# Altium PCB iMX6 Rex_V1I1_PCB.PcbDoc (part 4 of 8)
Units mm, origin at the board's own origin, x right, y up, seen from the top; angles counter-clockwise.
Board outline 70 x 40 mm, 12 copper layers (L1, L2, L3, L4, L5 (PWR), L6 (PWR), L7 (PWR), L8 (PWR), L9, L10, L11, L12), stack 1.566 mm thick; 473 components, 409 nets, 2294 pads, 1880 vias.
Unrouted connection lines stored in the file: 7.
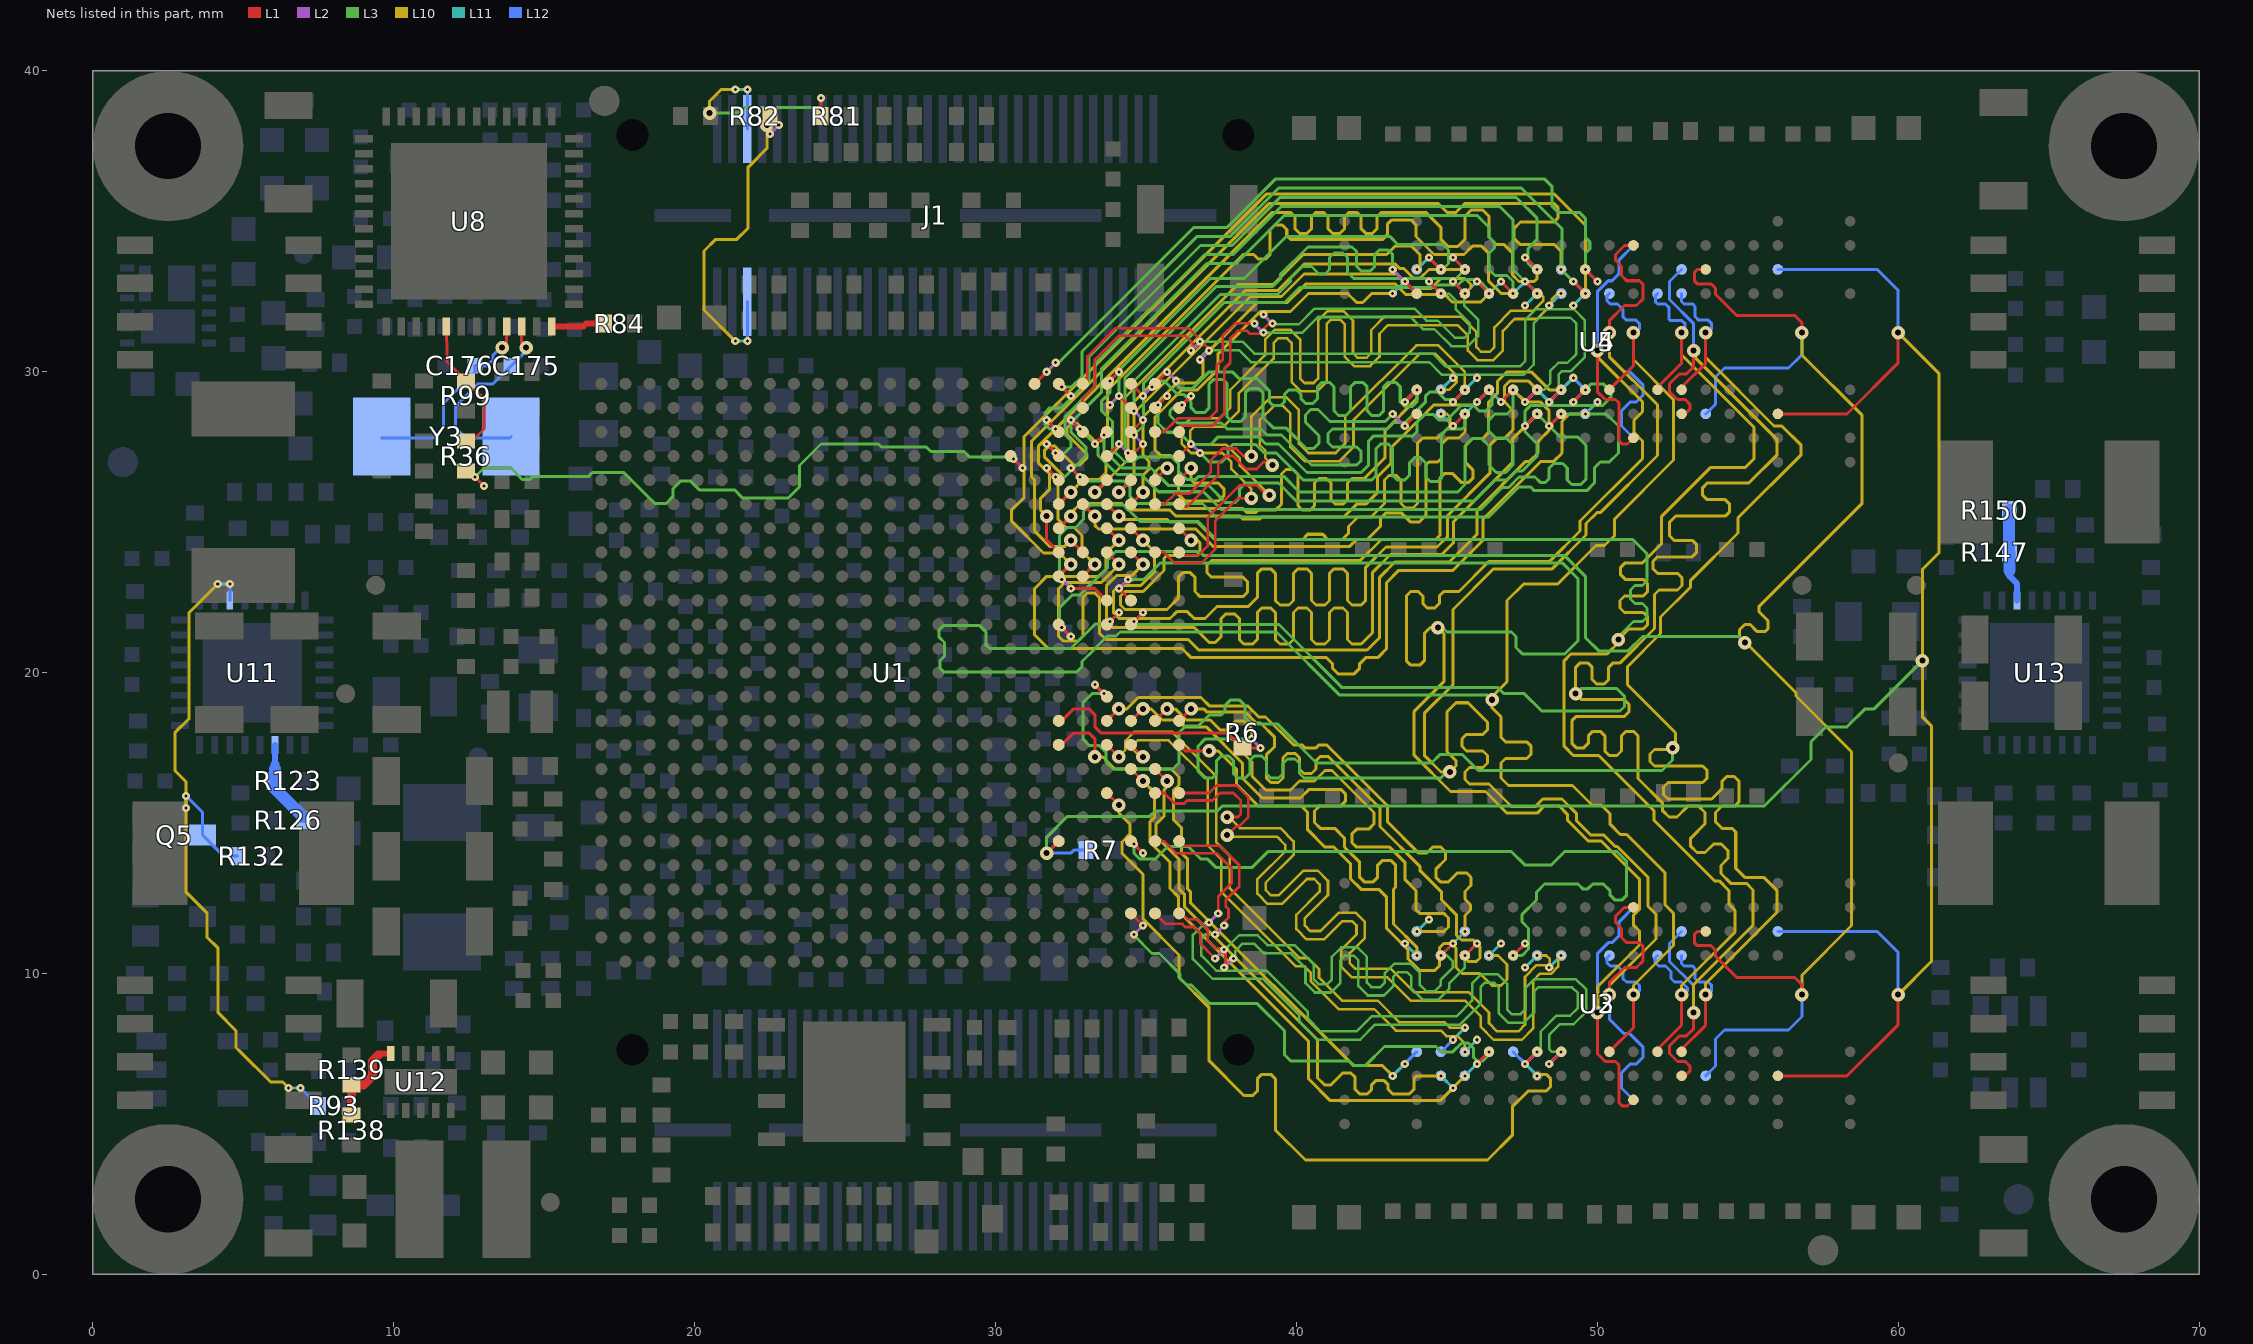
[diagram p14: the nets of this part, all layers, seen from the top]

## Via types
v1: diameter 0.45, hole 0.2, L1 to L12, tented both sides, 761 vias
v2: diameter 0.27, hole 0.1, L1 to L2, 305 vias
v3: diameter 0.27, hole 0.1, L2 to L3, 290 vias
v4: diameter 0.45, hole 0.2, L3 to L10, 196 vias
v5: diameter 0.27, hole 0.1, L11 to L12, 185 vias
v6: diameter 0.27, hole 0.1, L10 to L11, 142 vias
v7: diameter 0.45, hole 0.2, L3 to L10, tented both sides, 1 vias

## Nets (pads, with @x,y where several pads share a name; then routed paths per layer and width w, separated by ;. In a path a pad name is that pad's centre, name@x,y a point inside that pad or via, vN(x,y) a via of type N, cw(c..) or ccw(c..) an arc to the next point about the centre after c; other vN are vias at no path point) (continued)
DRAM_D25: U1.Y10 U3.A7 | length 19.9
  L1 w0.1: U1.Y10@32.1,17.6 32.2,17.6 32.6,18 33.1,18 33.3,17.8 v1(33.3,17.2)
  L10 w0.1: v1(33.3,17.2) 33.57,17.2 33.97,16.8 35.83,16.8 36.1,16.53 36.1,16.27 35.909,16.078 35.909,15.122 36.183,14.847 36.183,14 36.383,13.8 36.383,12.813 36.475,12.721 36.475,12.362 41.9,6.937 42.863,6.937 v6(43.2,6.6)
  L11 w0.1: v6(43.2,6.6) v5(43.6,7)
  L12 w0.1: v5(43.6,7) U3.A7@44,7.4
DRAM_D26: U1.AE11 U3.C3 | length 19.8
  L1 w0.1: U1.AE11@36.1,18.4 v1(36.5,18.8)
  L10 w0.1: v1(36.5,18.8) 36.917,18.8 37.017,18.7 38.287,18.7 38.662,18.325 38.805,18.325 39.275,17.855 39.275,17.545 39,17.27 39,16.5 39.15,16.35 39.4,16.35 39.55,16.5 39.55,17.17 39.7,17.32 39.95,17.32 40.1,17.17 40.1,16.8 40.25,16.65 40.5,16.65 40.65,16.8 40.65,17.07 40.8,17.22 41.05,17.22 42.775,15.495 42.775,14.888 44.1,13.563 44.1,13.43 44.825,12.705 44.825,12.445 45.315,11.955 45.315,11.282 45.482,11.115 45.885,11.115 46.1,10.9 46.1,10.52 45.98,10.4 45.7,10.4 45.6,10.5 v6(45.6,10.6)
  L11 w0.1: v6(45.6,10.6) v5(46,11)
  L12 w0.1: v6(45.6,10.6) v5(46,11)
DRAM_D27: U1.AB11 U3.C2 | length 19.8
  L1 w0.1: U1.AB11@33.7,18.4 v1(34.1,18.8)
  L10 w0.1: v1(34.1,18.8) 34.37,18.8 34.745,19.175 36.825,19.175 37.1,18.9 38.37,18.9 38.745,18.525 38.975,18.525 39.9,17.6 40.181,17.6 40.291,17.491 40.641,17.491 40.75,17.6 41,17.6 43.025,15.575 43.025,15.041 44.066,14 44.321,14 44.53,14.209 44.8,14.209 44.95,14.059 44.95,13.789 44.63,13.47 44.63,13.2 44.78,13.05 45.05,13.05 45.35,13.35 45.65,13.35 45.8,13.2 45.8,12.93 45.6,12.73 45.6,12.47 45.785,12.285 45.785,12.115 45.6,11.93 v6(45.6,11.4)
  L11 w0.1: v5(45.2,11) v6(45.6,11.4)
  L12 w0.1: v5(45.2,11) v6(45.6,11.4)
DRAM_D28: U1.AC9 U3.C8 | length 19.8
  L1 w0.1: U1.AC9@34.5,16.8 v1(34.9,16.4)
  L10 w0.1: v1(34.9,16.4) 35.275,16.025 35.275,15.188 35.125,15.038 35.125,14.375 35.8,13.7 35.8,12.83 36.075,12.555 36.075,12.079 40.4,7.754 40.4,6.5 41.125,5.775 44.775,5.775 v6(45.6,6.6)
  L11 w0.1: v6(45.6,6.6) v5(46,7)
  L12 w0.1: v6(45.6,6.6) v5(46,7)
DRAM_D29: U1.AD9 U3.B8 | length 19.8
  L1 w0.1: U1.AD9@35.3,16.8 v1(35.7,16.4)
  L10 w0.1: v1(35.7,16.4) 35.7,16.2 35.604,16.104 35.604,15.235 35.325,14.955 35.325,14.575 36.092,13.809 36.092,12.822 36.275,12.638 36.275,12.225 40.7,7.8 40.7,6.53 40.93,6.3 41.15,6.3 41.55,6.7 41.8,6.7 41.95,6.55 41.95,6.15 42.1,6 42.35,6 42.5,6.15 42.5,6.3 42.65,6.45 42.9,6.45 43.05,6.3 43.05,6.15 43.2,6 43.75,6 43.9,6.15 43.9,6.5 44,6.6 v6(44.8,6.6)
  L11 w0.1: v6(44.8,6.6) v5(45.2,6.2)
  L12 w0.1: v6(44.8,6.6) v5(45.2,6.2)
DRAM_D30: U1.AD11 U3.A2 | length 19.8
  L1 w0.1: U1.AD11@35.3,18.4 v1(35.7,18.8)
  L10 w0.1: v1(35.7,18.8) 35.97,18.8 36.345,18.425 37.132,18.425 37.457,18.1 37.7,18.1 38,18.4 38.243,18.4 38.525,18.118 38.525,17.875 38.225,17.575 38.225,17.332 38.525,17.032 38.525,16.558 38.983,16.1 39.8,16.1 40.1,16.4 40.6,16.4 40.95,16.75 41.18,16.75 42.575,15.355 42.575,14.975 42.4,14.8 42,14.8 41.85,14.65 41.85,14.35 42,14.2 43.1,14.2 43.6,13.7 43.6,13.13 43.975,12.755 43.975,12.125 44.1,12 44.9,12 45.05,11.85 45.05,11.55 44.9,11.4 v6(44,11.4)
  L11 w0.1: v6(44,11.4) v5(44.4,11.8)
  L12 w0.1: v6(44,11.4) v5(44.4,11.8)
DRAM_D31: U1.AC11 U3.A3 | length 19.8
  L1 w0.1: U1.AC11@34.5,18.4 v1(34.9,18.8)
  L10 w0.1: v1(34.9,18.8) 35.17,18.8 35.545,18.425 36.062,18.425 36.287,18.2 37,18.2 38.2,17 38.2,16.5 38.863,15.837 40.137,15.837 40.425,16.125 41.475,16.125 41.625,15.975 41.625,15.725 41.475,15.575 40.775,15.575 40.6,15.4 40.6,15.02 40.795,14.825 41.275,14.825 41.6,14.5 41.6,14.2 42.1,13.7 42.1,13.2 42.25,13.05 42.55,13.05 42.7,13.2 42.7,13.6 42.85,13.75 43.15,13.75 43.3,13.6 43.3,12.875 43.225,12.8 43.225,11.645 44,10.87 v6(44,10.6)
  L11 w0.1: v5(43.6,11) v6(44,10.6)
  L12 w0.1: v5(43.6,11) v6(44,10.6)
DRAM_D32: U1.AA17 U5.E3 | length 31.9
  L1 w0.1: U1.AA17@32.9,23.2 v1(33.3,23.6)
  L10 w0.1: v1(33.3,23.6) 32.875,24.025 32.875,24.555 32.605,24.825 32.345,24.825 32.075,25.095 32.075,26.205 32.235,26.365 32.235,26.565 31.622,27.177 31.622,27.377 31.773,27.527 31.972,27.527 32.6,26.9 32.8,26.9 33.025,27.125 33.025,27.275 32.373,27.928 32.373,28.127 32.523,28.277 32.722,28.277 33.3,27.7 33.5,27.7 33.725,27.925 33.725,29.397 38.228,33.9 38.578,33.9 38.728,33.75 38.978,33.75 39.128,33.9 39.128,34.728 39.278,34.878 39.528,34.878 39.678,34.728 39.678,34.522 39.8,34.4 42.87,34.4 43.02,34.55 43.02,34.9 43.17,35.05 43.815,35.05 43.975,34.89 43.975,34.495 44.57,33.9 45.57,33.9 45.845,34.175 46.155,34.175 46.375,33.955 46.375,33.028 46.803,32.6 v6(47.2,32.6)
  L11 w0.1: v6(47.2,32.6) v5(47.6,33)
  L12 w0.1: v6(47.2,32.6) v5(47.6,33)
DRAM_D33: U1.AA18 U5.G2 | length 31.9
  L1 w0.1: v1(32.5,24.4) U1.AA18@32.9,24
  L10 w0.1: v1(32.5,24.4) 32.3,24.2 31.8,24.2 31.3,24.7 31.3,26.4 31.2,26.5 31.2,27.7 39.1,35.6 44.7,35.6 45,35.3 45.3,35.3 45.6,35.6 48.55,35.6 48.7,35.45 48.7,35.12 48.555,34.975 47.445,34.975 47.225,34.755 47.225,34.445 47.445,34.225 48.575,34.225 48.8,34 v6(48.8,33.4)
  L11 w0.1: v6(48.8,33.4) v5(49.2,33)
  L12 w0.1: v6(48.8,33.4) v5(49.2,33)
DRAM_D34: U1.AC18 U5.F8 | length 31.9
  L1 w0.1: U1.AC18@34.5,24 v1(34.9,23.6)
  L10 w0.1: v1(34.9,23.6) 34.525,23.225 34.021,23.225 33.683,22.887 33.683,21.702 33.885,21.5 36.6,21.5 37.1,21 37.3,21 37.5,21.2 37.5,21.8 37.65,21.95 37.95,21.95 38.1,21.8 38.1,21.1 38.25,20.95 38.55,20.95 38.7,21.1 38.7,22 38.85,22.15 39.15,22.15 39.3,22 39.3,21.1 39.45,20.95 39.75,20.95 39.9,21.1 39.9,22 40.05,22.15 40.35,22.15 40.5,22 40.5,21.1 40.65,20.95 40.95,20.95 41.1,21.1 41.1,22 41.25,22.15 41.55,22.15 41.7,22 41.7,21.1 41.85,20.95 42.15,20.95 42.533,21.333 42.533,23.333 43.125,23.925 44.825,23.925 45.225,24.325 45.225,25.025 47.175,26.975 47.175,27.762 48,28.587 v6(48,28.6)
  L11 w0.1: v5(47.6,28.2) v6(48,28.6)
  L12 w0.1: v5(47.6,28.2) v6(48,28.6)
DRAM_D35: U1.AE19 U5.H7 | length 31.9
  L1 w0.1: U1.AE19@36.1,24.8 v1(36.5,24.4)
  L10 w0.1: v1(36.5,24.4) 36.7,24.4 36.8,24.3 36.8,24 36.7,23.9 35.7,23.9 35.6,23.8 35.6,23.392 34.908,22.7 34.3,22.7 34.15,22.55 34.15,22.25 34.3,22.1 35.7,22.1 36.075,22.475 36.075,23.175 36.225,23.325 36.475,23.325 36.625,23.175 36.625,22.7 36.8,22.525 38.225,22.525 38.375,22.675 38.375,23.025 38.225,23.175 37.175,23.175 37.025,23.325 37.025,23.575 37.175,23.725 42.125,23.725 42.825,24.425 44.625,24.425 44.775,24.575 44.775,26.475 44.925,26.625 45.175,26.625 45.475,26.325 45.725,26.325 45.875,26.475 45.875,26.725 45.625,26.975 45.625,27.555 45.845,27.775 46.18,27.775 46.375,27.97 46.375,28.972 46.685,29.282 46.685,29.685 47,30 47.803,30 48.403,29.4 v6(48.8,29.4)
  L11 w0.1: v6(48.8,29.4) v5(49.2,29.8)
  L12 w0.1: v5(49.2,29.8) U5.H7@49.6,29.4
DRAM_D36: U1.Y17 U5.H3 | length 31.9
  L1 w0.1: U1.Y17@32.1,23.2 v1(32.5,23.6)
  L10 w0.1: v1(32.5,23.6) 32.125,23.975 31.595,23.975 30.525,25.045 30.525,25.4 30.95,25.825 30.95,27.85 39,35.9 48.575,35.9 49.6,34.875 v6(49.6,32.6)
  L11 w0.1: v5(49.2,32.2) v6(49.6,32.6)
  L12 w0.1: v5(49.2,32.2) v6(49.6,32.6)
DRAM_D37: U1.Y18 U5.F2 | length 31.9
  L1 w0.1: v1(31.7,25.2) 31.7,24.4 U1.Y18@32.1,24
  L10 w0.1: v1(31.7,25.2) 31.5,25.4 31.5,25.8 31.8,26.1 31.8,26.6 31.423,26.978 31.423,27.522 39.2,35.3 39.8,35.3 39.95,35.15 39.95,34.75 40.1,34.6 40.35,34.6 40.5,34.75 40.5,35.15 40.65,35.3 40.9,35.3 41.05,35.15 41.05,34.75 41.2,34.6 41.45,34.6 41.6,34.75 41.6,35.15 41.75,35.3 42,35.3 42.15,35.15 42.15,34.75 42.3,34.6 42.525,34.6 42.675,34.75 42.675,35.15 42.825,35.3 44.3,35.3 44.8,34.8 44.8,34.4 45.03,34.17 45.37,34.17 45.6,34.4 45.6,35.17 45.8,35.37 46.2,35.37 46.4,35.17 46.4,34.47 46.645,34.225 46.905,34.225 47.175,33.955 47.175,33.225 47.4,33 47.9,33 48,33.1 v6(48,33.4)
  L11 w0.1: v5(47.6,33.8) v6(48,33.4)
  L12 w0.1: v5(47.6,33.8) v6(48,33.4)
DRAM_D38: U1.AB19 U5.H8 | length 31.9
  L1 w0.1: U1.AB19@33.7,24.8 v1(34.1,24.4)
  L10 w0.1: v1(34.1,24.4) 33.675,23.975 33.675,23.445 33.43,23.2 31.7,23.2 31.3,22.8 31.3,21.25 31.75,20.8 36.2,20.8 36.5,20.5 41,20.5 41.2,20.3 41.2,20.15 41.4,19.95 41.9,19.95 42.1,20.15 42.1,20.3 42.3,20.5 42.7,20.5 43,20.8 43,23 43.4,23.4 45.2,23.4 46.2,24.4 46.2,25.1 48.125,27.025 48.555,27.025 48.825,27.295 48.825,28.355 49.07,28.6 v6(49.6,28.6)
  L11 w0.1: v6(49.6,28.6) v5(50,29)
  L12 w0.1: v6(49.6,28.6) v5(50,29)
DRAM_D39: U1.AC19 U5.F7 | length 31.9
  L1 w0.1: U1.AC19@34.5,24.8 v1(34.9,24.4)
  L10 w0.1: v1(34.9,24.4) 35.275,24.025 35.275,23.35 34.825,22.9 34.1,22.9 33.917,22.717 33.917,21.983 34.1,21.8 35.8,21.8 36.025,22.025 36.375,22.025 36.6,21.8 36.958,21.8 37.358,22.2 38.4,22.2 38.7,22.5 38.7,23.3 38.85,23.45 39.15,23.45 39.3,23.3 39.3,22.4 39.45,22.25 39.75,22.25 39.9,22.4 39.9,23.3 40.05,23.45 40.35,23.45 40.5,23.3 40.5,22.4 40.65,22.25 40.95,22.25 41.1,22.4 41.1,23.3 41.25,23.45 41.55,23.45 41.7,23.3 41.7,22.4 41.85,22.25 42.15,22.25 42.3,22.4 42.3,23.5 42.975,24.175 44.675,24.175 45.025,24.525 45.025,25.225 46.425,26.625 46.425,27.555 46.645,27.775 46.905,27.775 47.2,28.07 47.2,28.715 46.915,29 46.915,29.518 47.097,29.7 47.7,29.7 v6(48,29.4)
  L11 w0.1: v6(48,29.4) v5(48.4,29)
  L12 w0.1: v6(48,29.4) v5(48.4,29)
DRAM_D40: U1.Y19 U5.D7 | length 18.4
  L1 w0.1: U1.Y19@32.1,24.8 v1(32.5,25.2)
  L10 w0.1: v1(32.5,25.2) 32.5,25.3 32.825,25.625 34.205,25.625 34.43,25.4 35.8,25.4 36,25.2 38.125,25.2 38.225,25.1 38.77,25.1 38.845,25.175 41.575,25.175 42,25.6 42.3,25.6 42.7,26 42.7,26.517 43.15,26.967 43.15,27.48 44.57,28.9 45.9,28.9 v6(46.4,29.4)
  L11 w0.1: v6(46.4,29.4) v5(46.8,29)
  L12 w0.1: v6(46.4,29.4) v5(46.8,29)
DRAM_D41: U1.AB20 U5.B8 | length 18.5
  L1 w0.1: U1.AB20@33.7,25.6 v1(34.1,25.2)
  L10 w0.1: v1(34.1,25.2) 34.213,25.088 35.712,25.088 35.8,25 36.713,25 37.288,24.425 40.2,24.425 40.375,24.6 40.87,24.6 41.045,24.425 41.525,24.425 41.73,24.63 41.73,24.861 42.045,25.175 42.475,25.175 42.925,25.625 42.925,26.4 43.075,26.55 43.325,26.55 43.475,26.4 43.475,25.625 43.625,25.475 43.875,25.475 44.025,25.625 44.025,27.625 44.2,27.8 44.7,27.8 45.1,28.2 45.1,28.5 45,28.6 v6(44.8,28.6)
  L11 w0.1: v6(44.8,28.6) v5(45.2,28.2)
  L12 w0.1: v6(44.8,28.6) v5(45.2,28.2)
DRAM_D42: U1.AB21 U5.C2 | length 18.4
  L1 w0.1: v1(33.3,26) U1.AB21@33.7,26.4
  L10 w0.1: v1(33.3,26) 33.313,26 34.4,27.087 34.4,28.8 38.3,32.7 39.383,32.7 40.258,33.575 43.295,33.575 43.445,33.425 43.572,33.425 43.882,33.115 44.118,33.115 44.403,33.4 v6(45.6,33.4)
  L11 w0.1: v5(45.2,33) v6(45.6,33.4)
  L12 w0.1: v5(45.2,33) v6(45.6,33.4)
DRAM_D43: U1.AD21 U5.A7 | length 18.4
  L1 w0.1: U1.AD21@35.3,26.4 v1(35.7,26.8)
  L10 w0.1: v1(35.7,26.8) 35.434,26.8 35.275,26.641 35.275,25.825 35.5,25.6 36,25.6 36.15,25.45 38.22,25.45 38.345,25.325 38.655,25.325 38.73,25.4 39.3,25.4 39.5,25.6 39.5,26.6 39.65,26.75 39.9,26.75 40.05,26.6 40.05,25.55 40.2,25.4 40.45,25.4 40.6,25.55 40.6,26.3 40.75,26.45 41,26.45 41.15,26.3 41.15,25.75 41.3,25.6 41.55,25.6 41.7,25.75 41.7,26.3 41.85,26.45 42.25,26.45 42.95,27.15 42.95,28.05 44,29.1 v6(44,29.4)
  L11 w0.1: v5(43.6,29) v6(44,29.4)
  L12 w0.1: v5(43.6,29) v6(44,29.4)
DRAM_D44: U1.Y20 U5.A2 | length 18.4
  L1 w0.1: U1.Y20@32.1,25.6 v1(32.5,26)
  L10 w0.1: v1(32.5,26) 32.925,26.425 33.455,26.425 33.675,26.645 33.675,27.075 34.2,27.6 34.2,29.046 38.054,32.9 39.23,32.9 40.23,33.9 43,33.9 43.275,34.175 43.825,34.175 44.1,33.9 44.1,33.5 v6(44,33.4)
  L11 w0.1: v6(44,33.4) v5(44.4,33.8)
  L12 w0.1: v6(44,33.4) v5(44.4,33.8)
DRAM_D45: U1.AA20 U5.C8 | length 18.4
  L1 w0.1: U1.AA20@32.9,25.6 v1(33.3,25.2)
  L10 w0.1: v1(33.3,25.2) 33.3,24.9 33.425,24.775 36.655,24.775 37.23,24.2 41.775,24.2 42,24.425 42.355,24.425 42.793,24.863 42.793,25.136 42.957,25.3 43.5,25.3 43.8,25 44.07,25 44.3,25.23 44.3,26.9 44.4,27 44.7,27 44.825,27.125 44.825,27.6 45.025,27.8 45.4,27.8 45.6,28 v6(45.6,28.6)
  L11 w0.1: v6(45.6,28.6) v5(46,29)
  L12 w0.1: v6(45.6,28.6) v5(46,29)
DRAM_D46: U1.AE21 U5.A3 | length 18.5
  L1 w0.1: U1.AE21@36.1,26.4 v1(36.5,26.8)
  L10 w0.1: v1(36.5,26.8) 36.5,26.4 36.6,26.3 37.4,26.3 37.6,26.1 37.6,25.9 37.4,25.7 36.3,25.7 36.075,25.925 36.075,26.955 35.805,27.225 35.475,27.225 35.3,27.4 35.3,28.5 36.2,29.4 36.713,29.4 37.4,30.087 37.4,30.6 38.8,32 39.8,32 40.4,32.6 41.7,32.6 42,32.3 42.2,32.3 42.5,32.6 v6(43.2,32.6)
  L11 w0.1: v6(43.2,32.6) v5(43.6,33)
  L12 w0.1: v5(43.6,33) U5.A3@44,32.6
DRAM_D47: U1.AC21 U5.C3 | length 18.4
  L1 w0.1: v1(34.1,26) U1.AC21@34.5,26.4
  L10 w0.1: v1(34.1,26) 34.6,26.5 34.6,28.63 38.47,32.5 39.5,32.5 40.25,33.25 43.337,33.25 43.812,32.775 44.475,32.775 44.8,33.1 45.6,33.1 45.8,32.9 45.8,32.8 v6(45.6,32.6)
  L11 w0.1: v6(45.6,32.6) v5(46,33)
  L12 w0.1: v6(45.6,32.6) v5(46,33)
DRAM_D48: U1.AC22 U4.D7 | length 17.1
  L1 w0.1: U1.AC22@34.5,27.2 v2(34.9,27.6) ; v2(46,33) v3(46.4,32.6)
  L2 w0.1: v3(34.6,27.9) v2(34.9,27.6) ; v2(46,33) v3(46.4,32.6)
  L3 w0.1: v3(34.6,27.9) 34.915,28.215 34.915,29.618 37.597,32.3 39.6,32.3 40.1,32.8 44.538,32.8 44.623,32.885 45.368,32.885 45.541,33.059 46.041,33.059 46.4,32.7 v3(46.4,32.6)
DRAM_D49: U1.AE22 U4.C2 | length 17.1
  L1 w0.1: U1.AE22@36.1,27.2 v2(36.5,27.6) ; v2(45.2,28.2) v3(45.6,28.6)
  L2 w0.1: v2(36.5,27.6) v3(36.8,27.3) ; v2(45.2,28.2) v3(45.6,28.6)
  L3 w0.1: v3(36.8,27.3) 37.1,27 37.525,27 37.725,27.2 37.725,27.425 37.875,27.575 38.655,27.575 38.93,27.3 39.33,27.3 40.23,26.4 42.5,26.4 42.65,26.55 42.65,27.45 42.8,27.6 43.05,27.6 43.2,27.45 43.2,26.55 43.35,26.4 43.6,26.4 43.75,26.55 43.75,26.97 43.925,27.145 44.125,27.145 44.3,26.97 44.3,26.5 44.45,26.35 44.7,26.35 44.825,26.475 44.825,27.925 45,28.1 45.5,28.1 45.6,28.2 v3(45.6,28.6)
DRAM_D50: U1.AE24 U4.C3 | length 17.1
  L1 w0.1: U1.AE24@36.1,28.8 v2(36.5,29.2) ; v2(45.2,29) v3(45.6,29.4)
  L2 w0.1: v3(36.2,28.9) v2(36.5,29.2) ; v2(45.2,29) v3(45.6,29.4)
  L3 w0.1: v3(36.2,28.9) 36,28.9 35.8,28.7 35.8,28.55 36.05,28.3 37.5,28.3 37.7,28.1 38.825,28.1 39.025,27.9 39.5,27.9 40.5,26.9 42,26.9 42.15,27.05 42.15,27.35 42,27.5 41.2,27.5 41.05,27.65 41.05,27.95 41.2,28.1 43.017,28.1 43.232,28.315 43.615,28.315 44.285,28.985 44.285,29.185 44.435,29.335 44.685,29.335 44.935,29.085 45.285,29.085 v3(45.6,29.4)
DRAM_D51: U1.AC24 U4.B8 | length 17.2
  L1 w0.1: v2(34.1,29.2) U1.AC24@34.5,28.8 ; v2(44.4,33.8) v3(44.8,33.4)
  L2 w0.1: v3(33.8,28.9) v2(34.1,29.2) ; v2(44.4,33.8) v3(44.8,33.4)
  L3 w0.1: v3(33.8,28.9) v2(34.1,29.2) 34.1,30.055 37.145,33.1 38.27,33.1 39.67,34.5 43.1,34.5 43.375,34.225 44.875,34.225 45.05,34.05 45.05,33.6 44.85,33.4 v3(44.8,33.4)
DRAM_D52: U1.AB22 U4.A7 | length 17.2
  L1 w0.1: U1.AB22@33.7,27.2 v2(34.1,27.6) ; v2(43.6,33) U4.A7@44,32.6
  L2 w0.1: v2(34.1,27.6) v3(34.4,27.3) ; v3(43.2,33.4) v2(43.6,33)
  L3 w0.1: v3(34.4,27.3) 34.3,27.4 34.3,29.8 37.333,32.833 39.208,32.833 39.475,33.1 39.475,33.245 40.38,34.15 41.85,34.15 42,34 42,33.5 42.15,33.35 42.45,33.35 42.6,33.5 42.6,33.9 42.75,34.05 43.05,34.05 43.2,33.9 v3(43.2,33.4)
DRAM_D53: U1.AC23 U4.C8 | length 17.2
  L1 w0.1: U1.AC23@34.5,28 v2(34.9,28.4) ; v2(45.2,33.8) v3(45.6,33.4)
  L2 w0.1: v3(34.6,28.7) v2(34.9,28.4) ; v2(45.2,33.8) v3(45.6,33.4)
  L3 w0.1: v3(34.6,28.7) 34.6,29.695 37.471,32.567 39.367,32.567 39.8,33 39.8,33.117 40.183,33.5 40.5,33.5 40.75,33.25 40.95,33.25 41.1,33.4 41.1,33.8 41.25,33.95 41.55,33.95 41.7,33.8 41.7,33.3 41.9,33.1 45.3,33.1 v3(45.6,33.4)
DRAM_D54: U1.AD25 U4.A3 | length 17.1
  L1 w0.1: U1.AD25@35.3,29.6 v2(35.7,30) ; v2(43.6,29) v3(44,29.4)
  L2 w0.1: v2(35.7,30) v3(36,29.7) ; v2(43.6,29) v3(44,29.4)
  L3 w0.1: v3(36,29.7) 36,29.6 36.15,29.45 36.55,29.45 37.1,30 37.87,30 38.1,29.77 38.7,29.77 39.1,29.37 39.1,29 39.225,28.875 39.475,28.875 39.6,29 39.6,29.25 39.75,29.4 40,29.4 40.15,29.25 40.15,29.1 40.3,28.95 40.55,28.95 40.7,29.1 40.7,29.5 40.85,29.65 41.1,29.65 41.25,29.5 41.25,28.7 41.4,28.55 41.65,28.55 41.8,28.7 41.8,29.5 41.95,29.65 42.2,29.65 42.35,29.5 42.35,28.7 42.5,28.55 42.75,28.55 42.9,28.7 42.9,29.5 43.05,29.65 43.3,29.65 43.45,29.5 43.45,29 43.6,28.85 43.85,28.85 44,29 v3(44,29.4)
DRAM_D55: U1.AC25 U4.A2 | length 17.1
  L1 w0.1: U1.AC25@34.5,29.6 v2(34.9,29.2) ; v2(43.6,28.2) U4.A2@44,28.6
  L2 w0.1: v2(34.9,29.2) v3(35.2,29.5) ; v3(43.2,28.6) v2(43.6,28.2)
  L3 w0.1: v3(35.2,29.5) 35.4,29.7 35.597,29.7 36.047,29.25 36.253,29.25 36.5,29.003 36.5,28.8 36.65,28.65 36.95,28.65 37.1,28.8 37.1,29.6 37.25,29.75 37.55,29.75 37.7,29.6 37.7,28.5 37.85,28.35 38.15,28.35 38.3,28.5 38.3,29.3 38.45,29.45 38.737,29.45 38.887,29.3 38.887,28.483 39.245,28.125 39.658,28.125 40.331,27.451 40.575,27.451 40.751,27.628 40.751,27.871 40.3,28.323 40.3,28.566 40.477,28.743 40.72,28.743 41.113,28.35 42.95,28.35 v3(43.2,28.6)
DRAM_D56: U1.AB25 U4.E3 | length 25
  L1 w0.1: U1.AB25@33.7,29.6 v2(34.1,30) ; v2(46.8,29) v3(47.2,29.4)
  L2 w0.1: v3(33.8,29.7) v2(34.1,30) ; v2(46.8,29) v3(47.2,29.4)
  L3 w0.1: v3(33.8,29.7) 33.8,29.303 33.515,29.018 33.515,28.715 33.885,28.345 33.885,27.412 34.282,27.015 34.6,27.015 34.76,27.175 35.855,27.175 36.075,26.955 36.075,26.695 36.345,26.425 36.655,26.425 36.755,26.525 39.575,26.525 40.1,26 45.35,26 45.6,26.25 45.6,27.53 45.845,27.775 46.155,27.775 46.4,27.53 46.4,26.9 46.645,26.655 46.955,26.655 47.2,26.9 47.2,27.575 46.975,27.8 46.62,27.8 46.375,28.045 46.375,28.375 46.6,28.6 47,28.6 47.2,28.8 v3(47.2,29.4)
DRAM_D57: U1.AA21 U4.G2 | length 25
  L1 w0.1: v2(32.5,26.8) U1.AA21@32.9,26.4 ; v2(48.4,28.2) v3(48.8,28.6)
  L2 w0.1: v2(32.5,26.8) v3(32.8,26.5) ; v2(48.4,28.2) v3(48.8,28.6)
  L3 w0.1: v3(32.8,26.5) 32.925,26.375 34.255,26.375 34.475,26.155 34.475,25.85 34.7,25.625 36.875,25.625 37.325,25.175 46.4,25.175 47.4,26.175 47.775,26.175 47.9,26.05 49.65,26.05 49.9,26.3 49.9,26.8 50.1,27 50.4,27 50.7,27.3 50.7,28.2 50.3,28.6 v3(48.8,28.6)
DRAM_D58: U1.Y25 U4.H7 | length 25
  L1 w0.1: U1.Y25@32.1,29.6 v2(32.5,29.2) ; v2(49.2,33) v3(49.6,32.6)
  L2 w0.1: v3(32.2,29.5) v2(32.5,29.2) ; v2(49.2,33) v3(49.6,32.6)
  L3 w0.1: v3(32.2,29.5) 32.53,29.5 32.875,29.845 32.875,30.675 36.7,34.5 37.8,34.5 39.4,36.1 47.48,36.1 48.825,34.755 48.825,33.375 v3(49.6,32.6)
DRAM_D59: U1.Y22 U4.F7 | length 25
  L1 w0.1: v2(31.7,27.6) U1.Y22@32.1,27.2 ; v2(47.6,33) v3(48,32.6)
  L2 w0.1: v2(31.7,27.6) v3(32,27.3) ; v2(47.6,33) v3(48,32.6)
  L3 w0.1: v3(32,27.3) 32.3,27.3 32.514,27.514 32.514,27.7 32.315,27.899 32.315,28.515 33.3,29.5 33.3,30.255 36.945,33.9 37.9,33.9 39.5,35.5 46.75,35.5 47.2,35.05 47.2,33.4 v3(48,32.6)
DRAM_D60: U1.AB23 U4.H3 | length 25
  L1 w0.1: v2(33.3,27.6) U1.AB23@33.7,28 ; v2(49.2,29) v3(49.6,29.4)
  L2 w0.1: v2(33.3,27.6) v3(33.6,27.9) ; v2(49.2,29) v3(49.6,29.4)
  L3 w0.1: v3(33.6,27.9) 33.6,27.4 34.198,26.802 35.164,26.802 35.741,26.225 37.075,26.225 37.65,25.65 37.95,25.65 38.1,25.8 38.1,26.1 38.3,26.3 39.4,26.3 40,25.7 45.89,25.7 46.594,26.404 47,26.404 47.296,26.7 47.5,26.7 48,27.2 48,27.6 47.6,28 47.6,28.7 47.785,28.885 50.185,28.885 50.45,29.15 50.45,29.35 50.2,29.6 49.8,29.6 v3(49.6,29.4)
DRAM_D61: U1.AA23 U4.F2 | length 25
  L1 w0.1: v2(32.5,28.4) U1.AA23@32.9,28 ; v2(47.6,28.2) v3(48,28.6)
  L2 w0.1: v2(32.5,28.4) v3(32.8,28.1) ; v2(47.6,28.2) v3(48,28.6)
  L3 w0.1: v3(32.8,28.1) 33.4,27.5 33.4,27.23 34.042,26.588 34.842,26.588 35.418,26.012 36.913,26.012 37.5,25.425 46.125,25.425 46.852,26.152 47.052,26.152 47.4,26.5 47.926,26.5 48.1,26.326 48.276,26.326 48.4,26.45 48.4,26.8 48.55,26.95 48.85,26.95 49,26.8 49,26.4 49.15,26.25 49.45,26.25 49.625,26.425 49.625,27.555 49.355,27.825 48.775,27.825 v3(48,28.6)
DRAM_D62: U1.Y23 U4.F8 | length 25
  L1 w0.1: v2(31.7,28.4) U1.Y23@32.1,28 ; v2(47.6,33.8) v3(48,33.4)
  L2 w0.1: v2(31.7,28.4) v3(32,28.1) ; v2(47.6,33.8) v3(48,33.4)
  L3 w0.1: v3(32,28.1) 31.8,28.1 31.65,28.25 31.65,28.65 31.8,28.8 32.2,28.8 33.1,29.7 33.1,30.489 36.811,34.2 37.866,34.2 39.466,35.8 47.3,35.8 48,35.1 48,34.4 47.7,34.1 47.7,33.6 47.9,33.4 v3(48,33.4)
DRAM_D63: U1.W25 U4.H8 | length 25
  L1 w0.1: U1.W25@31.3,29.6 v2(31.7,30) ; v3(49.6,33.4) v2(50,33)
  L2 w0.1: v2(31.7,30) v3(32,30.3) ; v3(49.6,33.4) v2(50,33)
  L3 w0.1: v3(32,30.3) 32.095,30.3 36.595,34.8 37.7,34.8 39.3,36.4 48.25,36.4 48.5,36.15 48.5,35.5 48.7,35.3 49.4,35.3 49.6,35.1 49.6,34.47 49.75,34.32 49.75,34.08 49.6,33.93 v3(49.6,33.4)
DRAM_DQM0: U1.AC3 U2.D3 | length 17.3
  L1 w0.1: U1.AC3@34.5,12 v2(34.9,11.6) ; v2(46,7) v3(46.4,7.4)
  L2 w0.1: v3(34.6,11.3) v2(34.9,11.6) ; v2(46,7) v3(46.4,7.4)
  L3 w0.1: v3(34.6,11.3) 34.6,11.269 35.2,10.669 35.448,10.669 36.125,9.992 36.125,9.845 36.345,9.625 36.492,9.625 37.117,9 38.7,9 39.6,8.1 39.6,7.3 39.8,7.1 41.75,7.1 41.9,6.95 42.3,6.95 42.925,7.575 44.638,7.575 44.813,7.4 45.197,7.4 45.482,7.685 45.718,7.685 45.885,7.518 45.885,7.215 46,7.1 46.2,7.1 46.4,7.3 v3(46.4,7.4)
DRAM_DQM1: U1.AC6 U2.E7 | length 27.6
  L1 w0.1: U1.AC6@34.5,14.4 v2(34.9,14) ; v3(47.2,10.6) v2(47.6,11)
  L2 w0.1: v3(34.6,14.3) v2(34.9,14) ; v3(47.2,10.6) v2(47.6,11)
  L3 w0.1: v3(34.6,14.3) 34.6,14 34.8,13.8 35.3,13.8 35.725,14.225 36.4,14.225 36.825,13.8 37.051,13.8 37.32,13.531 38.531,13.531 39.05,14.05 47.15,14.05 47.6,13.6 48.46,13.6 48.91,14.05 50.65,14.05 50.975,13.725 50.975,12.6 50.825,12.45 50.575,12.45 50.425,12.6 50.425,12.75 50.2,12.975 49.845,12.975 49.685,12.815 49.515,12.815 49.355,12.975 48.245,12.975 47.975,12.705 47.975,12.445 47.5,11.97 47.5,11.715 47.715,11.5 47.715,10.815 47.5,10.6 v3(47.2,10.6)
DRAM_DQM2: U1.AB8 U3.E7 | length 28.5
  L1 w0.1: U1.AB8@33.7,16 v1(34.1,15.6)
  L10 w0.1: v1(34.1,15.6) 34.1,15.33 34.475,14.955 34.475,14.645 34.2,14.37 34.2,14 34.9,13.3 34.9,11.817 36.1,10.617 36.1,9.866 37.1,8.866 37.1,7.1 38.25,5.95 38.55,5.95 38.7,6.1 38.7,6.5 38.85,6.65 39.15,6.65 39.3,6.5 39.3,4.8 40.3,3.8 46.35,3.8 47.175,4.625 47.175,5.575 47.7,6.1 48.3,6.1 48.45,6.25 48.45,6.5 48.3,6.65 48.05,6.65 v6(48,6.6)
  L11 w0.1: v5(47.6,7) v6(48,6.6)
  L12 w0.1: U3.E7@47.2,7.4 v5(47.6,7)
DRAM_DQM3: U1.AE10 U3.D3 | length 19.8
  L1 w0.1: U1.AE10@36.1,17.6 36.3,17.4 v1(37.1,17.4)
  L10 w0.1: v1(37.1,17.4) 37.4,17.4 38,16.8 38,16.3 38.725,15.575 40.155,15.575 40.375,15.355 40.375,14.775 40.95,14.2 41.25,14.2 41.8,13.65 41.8,13.15 42.15,12.8 42.737,12.8 43,12.537 43,11.5 43.715,10.785 43.715,10.482 44.097,10.1 44.6,10.1 44.748,10.248 44.748,10.848 44.9,11 45.148,11 45.3,10.848 45.3,10.2 45.5,10 46.1,10 46.5,9.6 46.8,9.6 47,9.8 47,10.3 46.7,10.6 v6(46.4,10.6)
  L11 w0.1: v6(46.4,10.6) v5(46.8,11)
  L12 w0.1: v6(46.4,10.6) v5(46.8,11)
DRAM_DQM4: U1.AB18 U5.E7 | length 31.9
  L1 w0.1: U1.AB18@33.7,24 v1(34.1,23.6)
  L10 w0.1: v1(34.1,23.6) 34.1,23.587 33.513,23 32.3,23 32.1,22.8 32.1,21.2 32.25,21.05 32.747,21.05 32.9,21.203 32.9,22.5 33.05,22.65 33.3,22.65 33.45,22.5 33.45,21.317 33.667,21.1 36.4,21.1 36.75,20.75 42.35,20.75 42.767,21.167 42.767,23.167 43.275,23.675 45.075,23.675 46,24.6 46,25.4 47.625,27.025 47.755,27.025 48.025,27.295 48.025,27.683 48.4,28.058 48.4,28.7 48.1,29 v5(47.6,29) v6(47.2,29.4)
  L11 w0.1: v6(47.2,29.4) v5(47.6,29)
  L12 w0.1: v6(47.2,29.4) v5(47.6,29)
DRAM_DQM5: U1.AC20 U5.D3 | length 18.4
  L1 w0.1: U1.AC20@34.5,25.6 v1(34.9,26)
  L10 w0.1: v1(34.9,26) 34.9,26.563 35.1,26.763 35.1,27.025 34.9,27.225 34.9,28.5 36.025,29.625 36.655,29.625 36.9,29.87 36.9,30.5 38.7,32.3 39.7,32.3 40.325,32.925 43.278,32.925 43.628,32.575 44.925,32.575 45.185,32.315 46.115,32.315 v6(46.4,32.6)
  L11 w0.1: v6(46.4,32.6) v5(46.8,33)
  L12 w0.1: v6(46.4,32.6) v5(46.8,33)
DRAM_DQM6: U1.AD24 U4.D3 | length 17.1
  L1 w0.1: U1.AD24@35.3,28.8 v2(35.7,29.2) ; v2(46,29) v3(46.4,29.4)
  L2 w0.1: v3(35.4,28.9) v2(35.7,29.2) ; v2(46,29) v3(46.4,29.4)
  L3 w0.1: v3(35.4,28.9) 35.4,28.3 35.71,27.99 36.095,27.99 36.5,27.585 37.147,27.585 37.4,27.837 38.747,27.837 38.984,27.6 39.4,27.6 40.35,26.65 42.15,26.65 42.4,26.9 42.4,27.7 42.573,27.873 43.873,27.873 44,28 44,28.33 44.245,28.575 44.555,28.575 44.73,28.4 44.997,28.4 45.482,28.885 45.885,28.885 46.07,28.7 46.3,28.7 46.5,28.9 46.5,29.3 v3(46.4,29.4)
DRAM_DQM7: U1.Y21 U4.E7 | length 25
  L1 w0.1: v2(31.7,26.8) U1.Y21@32.1,26.4 ; v2(46.8,33) v3(47.2,32.6)
  L2 w0.1: v2(31.7,26.8) v3(32,26.5) ; v2(46.8,33) v3(47.2,32.6)
  L3 w0.1: v3(32,26.5) 32.3,26.5 33,27.2 33,27.497 32.515,27.982 32.515,28.315 33.515,29.315 33.515,30.095 37.02,33.6 38,33.6 39.6,35.2 46,35.2 46.4,34.8 46.4,34.47 46.585,34.285 46.585,34.115 46.4,33.93 46.4,33.4 46.6,33.2 47,33.2 47.2,33 v3(47.2,32.6)
DRAM_DQS0_N: U1.AD3 U2.B7 | length 17.4
  L1 w0.09: U1.AD3@35.3,12 35.645,11.655 36.191,11.655 36.296,11.55 36.6,11.55 36.804,11.346 36.804,10.996 v2(37.3,10.5) ; v3(44.8,10.6) v2(45.2,11)
  L2 w0.1: v2(37.3,10.5) v3(37.6,10.8) ; v3(44.8,10.6) v2(45.2,11)
  L3 w0.085: v3(37.6,10.8) 37.624,10.8 38.097,11.273 38.708,11.273 39.033,10.948 39.94,10.948 40.58,10.308 40.58,9.8 40.73,9.65 41.03,9.65 41.18,9.8 41.18,10.542 ; 41.18,10.558 41.494,10.872 42.026,10.872 42.34,10.558 42.34,9.7 42.49,9.55 42.79,9.55 42.94,9.7 42.94,10.016 43.254,10.33 43.786,10.33 44.1,10.016 44.1,9.616 44.3,9.416 44.6,9.416 44.8,9.616 44.8,9.796 45.2,10.196 45.2,10.4 45,10.6 v3(44.8,10.6)
DRAM_DQS0_P: U1.AE3 U2.C7 | length 17.4
  L1 w0.09: U1.AE3@36.1,12 36.2,12 36.4,11.8 36.704,11.8 37.054,11.45 37.054,11.1 37.314,10.84 37.441,10.84 37.64,10.641 37.64,10.24 v2(37.6,10.2) ; v3(45.6,10.6) v2(46,11)
  L2 w0.1: v2(37.6,10.2) v3(37.9,10.5) ; v3(45.6,10.6) v2(46,11)
  L3 w0.085: v3(37.9,10.5) 37.973,10.573 37.973,10.753 38.213,10.993 38.592,10.993 38.917,10.668 39.825,10.668 40.3,10.192 40.3,9.684 40.614,9.37 41.146,9.37 41.46,9.684 41.46,10.442 41.61,10.592 41.91,10.592 42.06,10.442 42.06,9.584 42.374,9.27 42.906,9.27 43.22,9.584 43.22,9.9 43.37,10.05 43.67,10.05 43.82,9.9 43.82,9.5 44.184,9.136 44.716,9.136 45.08,9.5 45.08,9.68 45.6,10.2 v3(45.6,10.6)
DRAM_DQS1_N: U1.AE6 U2.G3 | length 27.6
  L1 w0.09: U1.AE6@36.1,14.4 36.25,14.25 37.45,14.25 38.1,13.6 38.1,12.9 37.65,12.45 37.65,12.231 37.74,12.141 37.74,11.859 37.6,11.719 v2(37.6,11.6) ; v2(48.4,7) v3(48.8,7.4)
  L2 w0.1: v3(37.3,11.3) v2(37.6,11.6) ; v2(48.4,7) v3(48.8,7.4)
  L3 w0.085: v3(37.3,11.3) 36.973,11.3 36.84,11.168 36.84,10.594 37.334,10.1 39,10.1 40.38,8.72 40.38,8.5 40.8,8.08 42,8.08 42.5,8.58 45.32,8.58 45.84,9.1 45.84,9.666 46.154,9.98 46.686,9.98 47,9.666 47,8.8 47.15,8.65 47.45,8.65 47.62,8.82 47.62,9.52 47.918,9.818 49.278,9.818 49.632,9.463 49.632,8.737 49.216,8.32 48.766,8.32 48.4,7.954 48.4,7.5 48.5,7.4 v3(48.8,7.4)
DRAM_DQS1_P: U1.AD6 U2.F3 | length 27.6
  L1 w0.09: U1.AD6@35.3,14.4 35.6,14.4 36,14 37.346,14 37.85,13.496 37.85,13.004 37.4,12.554 v2(37.4,12) ; v2(47.6,7) v3(48,7.4)
  L2 w0.1: v3(37.1,11.7) v2(37.4,12) ; v2(47.6,7) v3(48,7.4)
  L3 w0.085: v3(37.1,11.7) 36.977,11.7 36.56,11.283 36.56,10.478 37.218,9.82 38.884,9.82 40.1,8.604 40.1,8.384 40.684,7.8 42.116,7.8 42.616,8.3 45.436,8.3 46.12,8.984 46.12,9.55 46.27,9.7 46.57,9.7 46.72,9.55 46.72,8.704 ; 46.72,8.684 47.034,8.37 47.566,8.37 47.9,8.704 47.9,9.404 48.034,9.538 49.162,9.538 49.352,9.348 49.352,8.852 49.1,8.6 48.65,8.6 48.12,8.07 48.12,7.52 v3(48,7.4)
DRAM_DQS2_N: U1.AE8 U3.G3 | length 28.6
  L1 w0.09: U1.AE8@36.1,16 37.1,16 37.35,16.25 38.004,16.25 38.4,15.854 38.4,15.196 38.104,14.9 38.008,14.9 37.708,14.6 v1(37.7,14.6)
  L10 w0.085: v1(37.7,14.6) 37.748,14.552 39.352,14.552 39.628,14.276 39.628,14.064 38.7,13.135 38.7,12.656 39.041,12.315 39.52,12.315 40.348,13.143 40.592,13.143 40.768,12.967 40.768,12.723 40,11.955 40,11.476 40.341,11.135 40.916,11.135 41.516,11.735 41.861,11.735 41.996,11.6 41.996,11.3 41.496,10.8 41.496,10.225 41.837,9.884 43.012,9.884 43.796,9.1 45.604,9.1 46.12,8.584 46.12,8.234 46.554,7.8 47.492,7.8 47.876,8.184 47.876,9.776 48.1,10 48.471,10 48.7,10.229 48.7,10.5 v6(48.8,10.6)
  L11 w0.1: v5(48.4,10.2) v6(48.8,10.6)
  L12 w0.09: v5(48.4,10.2) v6(48.8,10.6)
DRAM_DQS2_P: U1.AD8 U3.F3 | length 28.6
  L1 w0.09: U1.AD8@35.3,16 35.605,16 35.955,15.65 36.27,15.65 36.37,15.75 37.204,15.75 37.454,16 37.9,16 38.15,15.75 38.15,15.3 38.05,15.2 37.75,15.2 v1(37.7,15.2)
  L10 w0.085: v1(37.7,15.2) 37.754,15.2 38.122,14.833 39.468,14.833 39.908,14.392 39.908,13.948 38.98,13.019 38.98,12.772 39.157,12.595 39.404,12.595 40.233,13.423 40.708,13.423 41.048,13.083 41.048,12.607 40.28,11.839 40.28,11.592 40.457,11.415 40.8,11.415 41.4,12.015 41.977,12.015 42.276,11.716 42.276,11.184 41.776,10.684 41.776,10.341 41.953,10.164 43.128,10.164 43.912,9.38 45.72,9.38 46.4,8.7 46.4,8.35 46.67,8.08 47.376,8.08 47.596,8.3 47.596,9.892 47.984,10.28 48.355,10.28 48.42,10.345 48.42,10.48 48.3,10.6 v6(48,10.6)
  L11 w0.1: v5(47.6,10.2) v6(48,10.6)
  L12 w0.09: v5(47.6,10.2) v6(48,10.6)
DRAM_DQS3_N: U1.AB10 U3.B7 | length 19.9
  L1 w0.09: U1.AB10@33.7,17.6 v1(34.1,17.2)
  L10 w0.085: v1(34.1,17.2) 34.1,17.22 34.31,17.43 34.31,17.736 34.604,18.03 35.87,18.03 37.332,16.568 37.332,14.368 37.78,13.92 37.78,12.836 40.1,10.516 40.384,10.516 40.75,10.15 40.75,9.866 41.518,9.098 42.702,9.098 43.42,8.38 44.92,8.38 45.1,8.2 v6(45.6,8.2)
  L11 w0.1: v5(45.2,7.8) v6(45.6,8.2)
  L12 w0.09: U3.B7@44.8,7.4 v5(45.2,7.8)
DRAM_DQS3_P: U1.AC10 U3.C7 | length 19.9
  L1 w0.09: U1.AC10@34.5,17.6 v1(34.9,17.2)
  L10 w0.085: v1(34.9,17.2) 34.814,17.2 34.59,17.424 34.59,17.62 34.72,17.75 35.754,17.75 37.052,16.452 37.052,14.252 37.5,13.804 37.5,12.72 39.984,10.236 40.268,10.236 40.47,10.034 40.47,9.75 41.402,8.818 42.586,8.818 43.304,8.1 44.804,8.1 44.984,7.92 45.35,7.92 45.6,7.67 v6(45.6,7.4)
  L11 w0.1: v6(45.6,7.4) v5(46,7.8)
  L12 w0.09: v6(45.6,7.4) v5(46,7.8)
DRAM_DQS4_N: U1.AE18 U5.G3 | length 32
  L1 w0.09: U1.AE18@36.1,24 36.2,23.9 36.746,23.9 37.05,24.204 37.05,25.15 38.13,26.23 38.678,26.23 39.008,25.9 v1(39.1,25.9)
  L10 w0.085: v1(39.1,25.9) 38.117,26.883 38.117,27.115 37.652,27.58 36.616,27.58 36.466,27.73 36.466,28.03 36.616,28.18 37.576,28.18 38.08,28.684 38.08,29.28 39.24,30.44 39.24,30.96 39.39,31.11 39.69,31.11 39.84,30.96 39.84,29.66 40.154,29.346 40.686,29.346 41,29.66 41,31.584 41.15,31.734 41.45,31.734 41.6,31.584 41.6,30.5 41.914,30.186 42.446,30.186 42.76,30.5 42.76,31.264 43.048,31.552 45.348,31.552 45.7,31.2 45.7,30.7 46.014,30.386 46.546,30.386 46.86,30.7 46.86,31.36 47.254,31.754 48,31.754 48.48,32.234 48.48,32.4 48.68,32.6 v6(48.8,32.6)
  L11 w0.1: v5(48.4,32.2) v6(48.8,32.6)
  L12 w0.09: v5(48.4,32.2) v6(48.8,32.6)
DRAM_DQS4_P: U1.AD18 U5.F3 | length 32
  L1 w0.09: U1.AD18@35.3,24 35.6,24 35.95,23.65 36.85,23.65 37.3,24.1 37.3,25.046 38.054,25.8 v1(38.5,25.8)
  L10 w0.085: v1(38.5,25.8) 38.5,26.104 37.837,26.767 37.837,26.999 37.536,27.3 36.5,27.3 36.186,27.614 36.186,28.146 36.5,28.46 37.46,28.46 37.8,28.8 37.8,29.396 38.96,30.556 38.96,31.076 39.274,31.39 39.806,31.39 40.12,31.076 40.12,29.776 40.27,29.626 40.57,29.626 40.72,29.776 40.72,31.7 41.034,32.014 41.566,32.014 41.88,31.7 41.88,30.616 42.03,30.466 42.33,30.466 42.48,30.616 42.48,31.38 42.932,31.832 45.463,31.832 45.98,31.316 45.98,30.816 46.13,30.666 46.43,30.666 46.58,30.816 46.58,31.476 47.138,32.034 47.884,32.034 48.2,32.35 48.2,32.5 48.1,32.6 v6(48,32.6)
  L11 w0.1: v5(47.6,32.2) v6(48,32.6)
  L12 w0.09: v5(47.6,32.2) v6(48,32.6)
DRAM_DQS5_N: U1.AE20 U5.B7 | length 18.5
  L1 w0.09: U1.AE20@36.1,25.6 36.19,25.51 36.356,25.51 37.4,26.554 37.4,26.946 37.654,27.2 37.892,27.2 38.322,26.77 38.678,26.77 38.908,27 39.1,27 v1(39.2,26.9)
  L10 w0.085: v1(39.2,26.9) 38.963,27.137 38.963,27.392 38.78,27.574 38.78,28.4 39.248,28.868 39.552,28.868 39.8,28.62 39.8,27.5 40.28,27.02 41.416,27.02 41.896,27.5 41.896,28.396 44.1,30.6 44.6,30.6 45.32,29.88 45.32,29.647 45.073,29.4 v6(44.8,29.4)
  L11 w0.1: v6(44.8,29.4) v5(45.2,29.8)
  L12 w0.09: v6(44.8,29.4) v5(45.2,29.8)
DRAM_DQS5_P: U1.AD20 U5.C7 | length 18.5
  L1 w0.09: U1.AD20@35.3,25.6 35.612,25.6 35.957,25.945 36.438,25.945 37.15,26.657 37.15,27.05 37.55,27.45 37.995,27.45 38.245,27.2 v1(38.5,27.2)
  L10 w0.085: v1(38.5,27.2) 38.5,28.516 39.132,29.148 39.668,29.148 40.08,28.736 40.08,27.616 40.396,27.3 41.3,27.3 41.616,27.616 41.616,28.512 43.984,30.88 44.716,30.88 45.6,29.996 v6(45.6,29.4)
  L11 w0.1: v6(45.6,29.4) v5(46,29.8)
  L12 w0.09: v6(45.6,29.4) v5(46,29.8)
DRAM_DQS6_N: U1.AE23 U4.B7 | length 17.2
  L1 w0.09: U1.AE23@36.1,28 36.1,28.141 36.164,28.205 37.212,28.205 37.6,28.593 37.6,30.1 37.8,30.3 37.8,31.1 38.06,31.36 38.36,31.36 38.459,31.26 38.741,31.26 39.081,31.6 v2(39.2,31.6) ; v2(44.4,33) v3(44.8,32.6)
  L2 w0.1: v3(38.9,31.9) v2(39.2,31.6) ; v2(44.4,33) v3(44.8,32.6)
  L3 w0.085: v3(38.9,31.9) 39.22,31.58 40.08,31.58 40.6,32.1 43.916,32.1 44.316,31.7 44.696,31.7 45.266,31.13 45.585,31.13 45.755,31.3 45.755,31.619 45.3,32.074 45.3,32.373 45.073,32.6 v3(44.8,32.6)
DRAM_DQS6_P: U1.AD23 U4.C7 | length 17.2
  L1 w0.09: U1.AD23@35.3,28 35.605,28 36.06,28.455 37.109,28.455 37.35,28.696 37.35,30.204 37.55,30.404 37.55,31.204 37.956,31.61 38.59,31.61 v2(38.6,31.6) ; v2(45.2,33) v3(45.6,32.6)
  L2 w0.1: v2(38.6,31.6) v3(38.9,31.3) ; v2(45.2,33) v3(45.6,32.6)
  L3 w0.085: v3(38.9,31.3) 40.196,31.3 40.716,31.82 43.8,31.82 43.91,31.71 44.2,31.42 44.58,31.42 45.15,30.85 45.701,30.85 46.035,31.184 46.035,31.735 45.58,32.19 45.58,32.58 v3(45.6,32.6)
DRAM_DQS7_N: U1.AA24 U4.G3 | length 25
  L1 w0.09: U1.AA24@32.9,28.8 32.9,29.112 33.3,29.512 33.3,30.401 34.099,31.2 36.303,31.2 36.552,30.952 36.552,30.752 v2(36.5,30.7) ; v2(48.4,29) v3(48.8,29.4)
  L2 w0.1: v2(36.5,30.7) v3(36.8,31) ; v2(48.4,29) v3(48.8,29.4)
  L3 w0.085: v3(36.8,31) 38.2,31 38.6,30.6 44.53,30.6 44.95,30.18 47.43,30.18 47.6,30.35 47.6,31.716 47.964,32.08 49.216,32.08 49.58,31.716 49.58,30.48 49.12,30.02 48.82,30.02 48.72,29.92 48.72,29.48 v3(48.8,29.4)
DRAM_DQS7_P: U1.AA25 U4.F3 | length 25
  L1 w0.09: U1.AA25@32.9,29.6 33.05,29.75 33.05,30.505 33.995,31.45 36.407,31.45 37.1,30.757 v2(37.1,30.7) ; v2(47.6,29) v3(48,29.4)
  L2 w0.1: v3(36.8,30.4) v2(37.1,30.7) ; v2(47.6,29) v3(48,29.4)
  L3 w0.085: v3(36.8,30.4) 36.8,30.469 37.051,30.72 38.084,30.72 38.484,30.32 44.414,30.32 44.824,29.91 ; 44.834,29.9 47.546,29.9 47.88,30.234 47.88,31.6 48.08,31.8 49.1,31.8 49.3,31.6 49.3,30.596 49.004,30.3 48.704,30.3 48.44,30.036 48.44,29.618 48.222,29.4 v3(48,29.4)
DRAM_RAS_B: U1.AB15 U2.J3 U3.J3 U4.J3 U5.J3 | length 70.1
  L1 w0.1: U1.AB15@33.7,21.6 v2(34.1,22) ; U2.J3@50.4,7.4 51.2,8.2 v1(51.2,9.3) ; U4.J3@50.4,29.4 51.2,30.2 v1(51.2,31.3)
  L2 w0.1: v3(33.8,21.7) v2(34.1,22)
  L3 w0.1: v3(33.8,21.7) 33.715,21.615 33.312,21.615 32.497,20.8 29.8,20.8 29.675,20.925 29.675,21.355 29.455,21.575 28.275,21.575 28.125,21.425 28.125,21.175 28.3,21 28.3,20.55 28.15,20.4 28.15,20.15 28.275,20.025 32.7,20.025 32.875,20.2 32.875,20.372 33.285,20.782 33.285,20.788 33.712,21.215 34.001,21.215 34.136,21.35 39.335,21.35 41.435,19.25 46.35,19.25 v4(46.5,19.1)
  L10 w0.1: v1(51.2,9.3) 51.2,9.6 52.533,10.933 52.533,12 52.255,12.278 52.255,13.345 50.975,14.625 50.762,14.625 50.425,14.962 50.425,15.305 50.13,15.6 49.825,15.6 49.175,16.25 47.05,16.25 46.8,16.5 46.8,17 46.95,17.15 47.65,17.15 47.8,17.3 47.8,17.55 47.65,17.7 46.95,17.7 46.8,17.85 46.8,18.533 46.5,18.833 v4(46.5,19.1) 46.5,19.2 47,19.7 47,22.4 47.55,22.95 48.68,22.95 49.955,24.225 50.238,24.225 50.575,24.562 50.575,25.109 52.533,27.068 52.533,29.074 51.2,30.407 v1(51.2,31.3)
  L12 w0.1: U3.J3@50.4,10.6 50.316,10.516 50.316,10.366 50.433,10.25 50.667,10.25 50.846,10.071 50.846,9.837 50.966,9.716 51.284,9.716 51.4,9.6 51.4,9.425 51.275,9.3 v1(51.2,9.3) ; U5.J3@50.4,32.6 50.316,32.516 50.316,32.366 50.433,32.25 50.667,32.25 50.846,32.071 50.846,31.837 50.966,31.716 51.284,31.716 51.4,31.6 51.4,31.425 51.275,31.3 v1(51.2,31.3)
DRAM_RESET_B: R7.2 U1.Y6 U2.T2 U3.T2 U4.T2 U5.T2 | length 80.6
  L1 w0.1: v1(31.7,14) U1.Y6@32.1,14.4 ; U2.T2@56,6.6 58.3,6.6 60,8.3 v1(60,9.3) ; U4.T2@56,28.6 58.3,28.6 60,30.3 v1(60,31.3)
  L3 w0.1: v1(31.7,14) 31.7,14.53 32.395,15.225 35.125,15.225 35.3,15.4 37.37,15.4 37.545,15.575 55.558,15.575 57.1,17.117 57.1,17.7 57.6,18.2 58.3,18.2 58.9,18.8 59.2,18.8 v4(60.8,20.4)
  L10 w0.1: v1(60,9.3) 61.1,10.4 61.1,18.231 60.8,18.531 v4(60.8,20.4) 60.8,23.425 61.35,23.975 61.35,29.95 v1(60,31.3)
  L12 w0.1: v1@31.8,14.1 v1(31.7,14) 32.5,14 32.6,14.1 R7.2@33,14.1 ; U3.T2@56,11.4 59.3,11.4 60,10.7 v1(60,9.3) ; U5.T2@56,33.4 59.3,33.4 60,32.7 v1(60,31.3)
DRAM_SDBA0: U1.AC15 U2.M2 U3.M2 U4.M2 U5.M2 | length 80.2
  L1 w0.1: U1.AC15@34.5,21.6 v2(34.9,22) ; U2.M2@52.775,6.625 52.95,6.625 53.075,6.75 53.075,6.925 52.925,7.075 52.665,7.075 52.4,7.34 52.4,7.6 52.725,7.925 52.959,7.925 53.2,8.166 v1(53.2,8.7) ; U4.M2@52.775,28.625 52.95,28.625 53.075,28.75 53.075,28.925 52.925,29.075 52.665,29.075 52.4,29.34 52.4,29.6 52.725,29.925 52.959,29.925 53.2,30.166 v1(53.2,30.7)
  L2 w0.1: v3(34.6,21.7) v2(34.9,22)
  L3 w0.1: v3(34.6,21.7) 34.7,21.6 39.418,21.6 41.518,19.5 46.7,19.5 46.9,19.3 47.575,19.3 48.15,18.725 50.75,18.725 50.9,18.875 50.9,19.217 50.642,19.475 49.454,19.475 v4(49.279,19.3)
  L10 w0.1: v1(53.2,8.7) 53.2,9.634 55.175,11.609 55.175,12.78 54.955,13 54.43,13 54.107,13.323 54.107,13.593 54.336,13.821 54.336,14.091 54.127,14.3 53.857,14.3 53.579,14.021 53.309,14.021 53.1,14.23 53.1,14.5 53.575,14.975 53.575,15.355 53.355,15.575 53.025,15.575 52.65,15.2 52.38,15.2 52.171,15.409 52.171,15.658 51.35,16.479 51.35,17.9 51.2,18.05 50.95,18.05 50.8,17.9 50.8,17.4 50.65,17.25 50.4,17.25 50.25,17.4 50.25,17.9 50.1,18.05 49.85,18.05 49.7,17.9 49.7,17.65 49.55,17.5 49.3,17.5 49.15,17.65 49.15,18.4 49.3,18.55 50.9,18.55 51.05,18.7 51.05,18.95 50.9,19.1 49.479,19.1 v4(49.279,19.3) 49.279,20.179 49.429,20.329 49.679,20.329 49.829,20.179 49.829,19.771 49.979,19.621 50.229,19.621 50.379,19.771 50.379,20.179 50.529,20.329 50.759,20.329 51.9,21.47 51.9,22.6 52.05,22.75 52.667,22.75 52.817,22.9 52.817,23.15 52.667,23.3 52,23.3 51.85,23.45 51.85,23.7 52,23.85 53.15,23.85 53.3,24 53.3,24.25 53.15,24.4 52.55,24.4 52.4,24.55 52.4,25 52.6,25.2 54.25,25.2 54.4,25.35 54.4,25.6 54.25,25.75 53.65,25.75 53.5,25.9 53.5,26.15 53.65,26.3 55.03,26.3 55.975,27.245 55.975,27.744 53.2,30.519 v1(53.2,30.7)
  L12 w0.1: U3.M2@52.8,11.4 52.4,11 52.4,10.4 53.2,9.6 53.2,9.321 v1(53.2,8.7) ; U5.M2@52.8,33.4 52.4,33 52.4,32.4 53.2,31.6 v1(53.2,30.7)
DRAM_SDBA1: U1.Y15 U2.N8 U3.N8 U4.N8 U5.N8 | length 77.1
  L1 w0.1: U1.Y15@32.1,21.6 v2(32.5,21.2) ; U2.N8@53.6,11.4 53.325,11.4 53.225,11.3 53.225,11.025 53.325,10.925 53.775,10.925 53.925,10.775 53.925,10.575 54.625,9.875 56.55,9.875 56.8,9.625 v1(56.8,9.3) ; U4.N8@53.6,33.4 53.325,33.4 53.225,33.3 53.225,33.025 53.325,32.925 53.775,32.925 53.925,32.775 53.925,32.575 54.625,31.875 56.55,31.875 56.8,31.625 v1(56.8,31.3)
  L2 w0.1: v3(32.2,21.5) v2(32.5,21.2)
  L3 w0.1: v3(32.2,21.5) 32.125,21.575 32.125,22.155 32.555,22.585 32.815,22.585 33.725,23.495 33.725,23.755 33.995,24.025 36.775,24.025 36.9,23.9 48.9,23.9 49.6,23.2 49.6,21.17 50.045,20.725 51.025,20.725 51.5,21.2 54.7,21.2 v4(54.9,21)
  L10 w0.1: v1(56.8,9.3) 56.8,9.946 58.45,11.596 58.45,17.371 56.6,19.221 56.6,19.33 54.93,21 v4(54.9,21) 54.725,21.175 54.725,21.425 54.9,21.6 55.078,21.6 55.317,21.361 55.573,21.361 55.675,21.463 55.675,21.725 55.381,22.019 55.381,22.211 58.8,25.63 58.8,28.554 56.8,30.554 v1(56.8,31.3)
  L12 w0.1: U3.N8@53.6,6.6 53.925,6.925 53.925,7.825 54.225,8.125 56.355,8.125 56.8,8.57 v1(56.8,9.3) ; U5.N8@53.6,28.6 53.925,28.925 53.925,29.825 54.225,30.125 56.355,30.125 56.8,30.57 v1(56.8,31.3)
DRAM_SDBA2: U1.AB12 U2.M3 U3.M3 U4.M3 U5.M3 | length 72.4
  L1 w0.1: v2(33.3,19.6) U1.AB12@33.7,19.2 ; U2.M3@52.8,7.4 52.8,7.483 53.6,8.283 v1(53.6,9.3) ; U4.M3@52.8,29.4 52.8,29.483 53.6,30.283 v1(53.6,31.3)
  L2 w0.1: v2(33.3,19.6) v3(33.6,19.3)
  L3 w0.1: v3(33.6,19.3) 33.203,19.3 32.9,18.997 32.9,17.8 33.125,17.575 33.455,17.575 33.675,17.355 33.675,17.025 33.9,16.8 35.9,16.8 36.1,17 36.1,18 36.325,18.225 36.738,18.225 37.113,18.6 37.5,18.6 37.633,18.733 37.633,18.918 37.8,19.085 38.118,19.085 38.285,18.918 38.285,18.515 38.5,18.3 39.365,18.3 40.665,17 44.487,17 44.762,17.275 45.521,17.275 46.046,16.75 52.15,16.75 52.5,17.1 v4(52.5,17.5)
  L10 w0.1: v1(53.6,9.3) 53.6,9.67 55.975,12.045 55.975,12.755 55.53,13.2 54.9,13.2 54.6,13.5 54.6,14.7 54.475,14.825 54.145,14.825 53.925,15.045 53.925,15.355 54.145,15.575 54.575,15.575 54.7,15.7 54.7,16.4 54.55,16.55 54.3,16.55 54.15,16.4 54.15,16.15 53.8,15.8 52.35,15.8 52.2,15.95 52.2,16.2 52.35,16.35 53.5,16.35 53.65,16.5 53.65,16.75 53.5,16.9 51.9,16.9 51.75,17.05 51.75,17.3 51.9,17.45 52.45,17.45 v4(52.5,17.5) 52.6,17.6 52.6,18 51,19.6 51,20.2 52.1,21.3 52.1,21.85 53.1,22.85 53.1,23.07 54.675,24.645 54.675,25.145 56.775,27.245 56.775,27.555 56.13,28.2 55.873,28.2 53.6,30.473 v1(53.6,31.3)
  L12 w0.1: U3.M3@52.8,10.6 52.8,10.333 52.883,10.25 53.167,10.25 53.246,10.171 53.246,9.837 53.366,9.716 53.684,9.716 53.8,9.6 53.8,9.425 53.675,9.3 v1(53.6,9.3) ; U5.M3@52.8,32.6 52.8,32.333 52.883,32.25 53.167,32.25 53.246,32.171 53.246,31.837 53.366,31.716 53.684,31.716 53.8,31.6 53.8,31.425 53.675,31.3 v1(53.6,31.3)
DRAM_SDCKE0: R6.2 U1.Y11 U2.K9 U3.K9 U4.K9 U5.K9 | length 81.5
  L1 w0.1: U1.Y11@32.1,18.4 32.2,18.4 32.6,18.8 33.1,18.8 33.3,18.6 33.3,18.2 33.5,18 37.7,18 R6.2@38.2,17.5 v2(38.8,17.5) ; v1(50.4,9.3) 50.4,9.7 50.9,10.2 51.3,10.2 51.525,10.425 51.525,10.9 51.4,11.025 50.975,11.025 50.8,11.2 50.8,11.5 50.6,11.7 50.6,11.9 50.9,12.2 U2.K9@51.2,12.2 ; v1(50.4,31.3) 50.4,31.7 50.9,32.2 51.3,32.2 51.525,32.425 51.525,32.9 51.4,33.025 50.975,33.025 50.8,33.2 50.8,33.5 50.6,33.7 50.6,33.9 50.9,34.2 U4.K9@51.2,34.2
  L2 w0.1: v3(38.5,17.8) v2(38.8,17.5)
  L3 w0.1: v3(38.5,17.8) 36.97,17.8 36.725,17.555 36.725,16.725 36.95,16.5 37.2,16.5 37.35,16.65 37.35,17.08 37.5,17.23 37.75,17.23 37.9,17.08 37.9,16.65 38.05,16.5 38.3,16.5 38.45,16.65 38.45,17.08 38.6,17.23 38.85,17.23 39,17.08 39,16.65 39.15,16.5 39.4,16.5 39.55,16.65 39.55,16.98 39.7,17.13 39.95,17.13 40.1,16.98 40.1,16.65 40.25,16.5 44.8,16.5 45,16.7 v4(45.1,16.7)
  L10 w0.1: v1(50.4,9.3) 50.4,9.6 51.948,11.148 51.948,11.974 51.685,12.237 51.685,13.198 50.658,14.225 50.596,14.225 50.221,14.6 49.787,14.6 49.3,15.087 49.3,15.325 48.825,15.8 48.187,15.8 47.937,15.55 47.15,15.55 46.4,16.3 45.75,16.3 45.6,16.45 45.6,16.7 45.75,16.85 46.2,16.85 46.35,17 46.35,17.25 46.2,17.4 45.65,17.4 45.5,17.55 45.5,17.8 45.65,17.95 46.2,17.95 46.35,18.1 46.35,18.35 45.7,19 45.3,19 45,18.7 45,17.375 45.3,17.075 45.3,16.9 v4(45.1,16.7) 44.802,16.7 44.25,17.253 44.25,18.65 45.2,19.6 45.2,22.1 46.55,23.45 48.5,23.45 49.625,24.575 49.625,24.955 49.987,25.317 50.1,25.317 52,27.217 52,28.9 50.4,30.5 v1(50.4,31.3)
  L12 w0.1: v1(50.4,9.3) 50.4,8.487 50.888,8 51.075,8 51.525,7.55 51.525,7.225 51.3,7 51.1,7 50.8,6.7 50.8,6.2 U3.K9@51.2,5.8 ; v1(50.4,31.3) 50.4,30.487 50.888,30 51.075,30 51.525,29.55 51.525,29.225 51.3,29 51.1,29 50.8,28.7 50.8,28.2 U5.K9@51.2,27.8
DRAM_SDODT0: U1.AC16 U2.K1 U3.K1 U4.K1 U5.K1 | length 79.1
  L1 w0.1: v2(34.1,22.8) U1.AC16@34.5,22.4 ; v1(50,8.7) 50,7.34 50.265,7.075 50.6,7.075 50.725,6.95 50.725,5.7 50.825,5.6 51,5.6 U2.K1@51.2,5.8 ; v1(50,30.7) 50,29.34 50.265,29.075 50.6,29.075 50.725,28.95 50.725,27.7 50.825,27.6 51,27.6 U4.K1@51.2,27.8
  L2 w0.1: v2(34.1,22.8) v3(34.4,23.1)
  L3 w0.1: v3(34.4,23.1) 34.93,23.1 35.48,23.65 48.833,23.65 49.35,23.133 49.35,21.05 48.925,20.625 47.509,20.625 47.3,20.834 47.3,21.2 47.15,21.35 45,21.35 44.85,21.5 v4(44.7,21.5)
  L10 w0.1: v1(50,8.7) 50.025,8.725 50.025,9.574 51.4,10.949 51.4,11.416 51.198,11.618 51.198,11.928 51.4,12.13 51.4,13.138 50.138,14.4 49.704,14.4 49.004,15.1 49.004,15.296 48.725,15.575 48.245,15.575 48,15.33 47,15.33 46.28,16.05 45.12,16.05 43.9,17.27 43.9,18.7 44.9,19.7 44.9,21.3 v4(44.7,21.5) 44.45,21.5 44.25,21.3 44.25,20.4 44.1,20.25 43.8,20.25 43.65,20.4 43.65,22.55 43.8,22.7 44.05,22.7 44.2,22.55 44.2,22.3 44.35,22.15 44.6,22.15 44.75,22.3 44.75,22.55 44.9,22.7 45.4,22.7 46.4,23.7 48.417,23.7 49.425,24.708 49.425,25.038 51.5,27.113 51.5,27.7 51.225,27.975 51.225,28.4 51.5,28.675 51.5,29 50,30.5 v1(50,30.7)
  L12 w0.1: v1(50,8.7) 50,10.66 50.365,11.025 50.485,11.025 50.725,11.265 50.725,11.725 U3.K1@51.2,12.2 ; v1(50,30.7) 50,32.66 50.365,33.025 50.485,33.025 50.725,33.265 50.725,33.725 U5.K1@51.2,34.2
DRAM_WE_B: U1.AB16 U2.L3 U3.L3 U4.L3 U5.L3 | length 70.9
  L1 w0.1: v2(32.5,22.8) 33.3,22.8 U1.AB16@33.7,22.4 ; U2.L3@52,7.4 52,7.483 52.8,8.283 v1(52.8,9.3) ; U4.L3@52,29.4 52,29.483 52.8,30.283 v1(52.8,31.3)
  L2 w0.1: v3(32.2,23.1) v2(32.5,22.8)
  L3 w0.1: v3(32.2,23.1) 32.2,23.325 32.125,23.4 32.125,24.555 32.395,24.825 32.655,24.825 32.925,25.095 32.925,25.355 33.145,25.575 34.255,25.575 34.805,25.025 36.738,25.025 37.338,24.425 51.175,24.425 51.65,23.95 51.65,23.05 51.5,22.9 51.25,22.9 51.1,22.75 51.1,22.45 51.25,22.3 51.5,22.3 51.65,22.15 51.65,21.85 51.5,21.7 51.2,21.7 50.7,21.2 v4(50.7,21.1)
  L10 w0.1: v1(52.8,9.3) 52.8,9.6 54.575,11.375 54.575,12.1 54.375,12.3 54.375,12.755 54.05,13.08 53.895,13.08 51.875,15.1 51.875,15.421 50.046,17.25 49.2,17.25 48.9,17.55 48.9,20.4 49.125,20.625 50.325,20.625 50.7,21 v4(50.7,21.1) 51.05,21.45 51.525,21.45 51.675,21.6 51.675,21.85 51.525,22 50.9,22 50.75,22.15 50.75,22.4 50.9,22.55 51.525,22.55 51.675,22.7 51.675,22.95 51.525,23.1 50.925,23.1 50.775,23.25 50.775,23.5 50.925,23.65 51.5,23.65 52.125,24.275 52.125,25.179 53.771,26.825 54.925,26.825 55.2,27.1 55.2,28.166 52.8,30.566 v1(52.8,31.3)
  L12 w0.1: U3.L3@52,10.6 51.916,10.516 51.916,10.366 52.033,10.25 52.267,10.25 52.446,10.071 52.446,9.837 52.566,9.716 52.8,9.716 53,9.516 53,9.425 52.875,9.3 v1(52.8,9.3) ; U5.L3@52,32.6 51.925,32.525 51.925,32.325 52,32.25 52.267,32.25 52.375,32.142 52.375,31.758 52.433,31.7 52.817,31.7 52.921,31.596 52.921,31.396 52.825,31.3 v1(52.8,31.3)
EN_1V375: Q5.3 R93.2 R132.1 U11.27 | length 24.7
  L10 w0.1: v6(4.15,22.95) 3.2,22 3.2,18.475 2.725,18 2.725,16.745 3.1,16.37 v6(3.1,15.5) 3.1,12.7 3.8,12 3.8,11.2 4.162,10.838 4.162,8.696 4.759,8.1 4.759,7.541 4.9,7.4 5.9,6.4 6.3,6.4 v6(6.5,6.2)
  L11 w0.1: v6(3.1,15.5) v5(3.1,15.9) ; v6(4.15,22.95) v5(4.55,22.95) ; v6(6.5,6.2) v5(6.9,6.2)
  L12 w0.1: v5(3.1,15.9) 3.65,15.35 Q5.3@3.65,14.6 4.35,13.9 R132.1@4.8,13.9 ; U11.27@4.55,22.4 v5(4.55,22.95) ; v5(6.9,6.2) R93.2@7.5,5.6
ENET_LED_LINK: J1.56 R81.2 | length 7.9
  L1 w0.1: R81.2@24.2,38.5 v2(24.2,39.1)
  L2 w0.1: v3(24.2,38.7) v2(24.2,39.1)
  L3 w0.1: v4(20.5,38.6) 21.425,38.6 21.6,38.775 24.125,38.775 v3(24.2,38.7)
  L10 w0.1: v4(20.5,38.6) 20.5,39 20.883,39.383 v6(21.35,39.383)
  L11 w0.1: v6(21.35,39.383) v5(21.75,39.383)
  L12 w0.1: J1.56@21.75,38.07 v5(21.75,39.383)
ENET_LED_RX: J1.55 R82.2 | length 12
  L1 w0.1: v2(22.5,37.9) R82.2@22.5,38.5
  L2 w0.1: v2(22.5,37.9) v3(22.8,38.2)
  L3 w0.1: v4(22.4,38.2) v3(22.8,38.2)
  L10 w0.1: v6(21.35,31.017) 20.312,32.055 20.312,34.012 20.7,34.4 21.4,34.4 21.777,34.777 21.777,36.8 22.4,37.423 v4(22.4,38.2)
  L11 w0.1: v6(21.35,31.017) v5(21.75,31.017)
  L12 w0.1: v5(21.75,31.017) J1.55@21.75,32.33
ENET_REF_CLK: R36.2 U1.V22 | length 23
  L1 w0.1: R36.2@12.4,26.7 12.5,26.7 v2(13,26.2) ; U1.V22@30.5,27.2 v2(30.9,26.8)
  L2 w0.1: v3(12.7,26.5) v2(13,26.2) ; v3(30.6,27.1) v2(30.9,26.8)
  L3 w0.1: v3(12.7,26.5) 13,26.8 13.897,26.8 14.282,26.415 14.518,26.415 14.618,26.515 16.465,26.515 16.6,26.65 17.65,26.65 17.65,26.647 18.672,25.625 19.055,25.625 19.275,25.845 19.275,26.105 19.545,26.375 19.855,26.375 20.155,26.075 21.325,26.075 21.6,25.8 23.103,25.8 23.485,26.182 23.485,26.885 24.2,27.6 26.1,27.6 26.2,27.5 27.7,27.5 27.85,27.35 28.95,27.35 29.125,27.175 30.525,27.175 v3(30.6,27.1)
ENET_REF_CLK_R: R36.1 R99.2 U8.41 | length 4.7
  L1 w0.1: U8.41@11.75,31.51 11.75,31.005 11.775,30.98 11.775,30.325 R99.2@12.4,29.7 13,29.1 13,28.1 12.6,27.7 R36.1@12.4,27.7
ETH_ISET: R84.1 U8.48 | length 1.9
  L1 w0.2: U8.48@15.25,31.51 16.3,31.51 16.39,31.6 R84.1@17,31.6 ; R84.1@16.89,31.51 R84.1@17,31.4
ETH_OSCI_25MHZ: C175.1 U8.46 Y3.2 | length 6.7
  L1 w0.1: U8.46@14.25,31.51 14.25,30.95 v1(14.4,30.8)
  L12 w0.1: Y3.2@13.9,27.85 13.85,27.8 12.4,27.8 12.05,28.15 12.05,28.85 12.8,29.6 13.3,29.6 C175.1@13.9,30.2 14.4,30.7 v1(14.4,30.8)
ETH_OSCO_25MHZ: C176.1 U8.45 Y3.1 | length 6.8
  L1 w0.1: v1@13.6,30.7 13.75,30.85 U8.45@13.75,31.51
  L12 w0.1: Y3.1@9.6,27.8 11.3,27.8 11.65,28.15 11.65,28.95 12.7,30 C176.1@12.7,30.2 13.1,30.2 13.3,30.4 13.3,30.55 13.55,30.8 v1(13.6,30.8)
FB1_2V5: R147.1 R150.2 U13.11 | length 3.1
  L12 w0.2: 63.7,23.3 63.7,23.2 63.95,22.95 U13.11@63.95,22.4
  L12 w0.3: 63.7,23.3 63.7,23.4
  L12 w0.4: 63.7,23.4 R147.1@63.7,24 63.675,24.025 63.675,25.375 R150.2@63.7,25.4
FB1_3V3: R123.1 R126.2 U11.11 | length 2.6
  L12 w0.2: 6.05,16.95 U11.11@6.05,17.6
  L12 w0.3: 6.05,16.8 6.05,16.95
  L12 w0.4: R123.1@6,16.2 R126.2@7,15.2 ; R123.1@6.05,16.45 6.05,16.8
FB_3V0_SNVS: R138.1 R139.2 U12.5 | length 3
  L1 w0.2: 9.5,7.3 9.55,7.35 U12.5@9.9,7.35
  L1 w0.3: R138.1@8.6,5.3 R139.2@8.6,6.3 9,6.3 9.3,6.6 9.3,7.1 9.5,7.3